# Altium PCB FOLLOWER_10_15.PcbDoc
Units mm, origin at the board's own origin, x right, y up, seen from the top; angles counter-clockwise.
Board outline 53 x 61 mm, 4 copper layers (Top Layer, Mid-Layer 1, Mid-Layer 2, Bottom Layer); 48 components, 40 nets, 211 pads, 89 vias.
Unrouted connection lines stored in the file: 49.
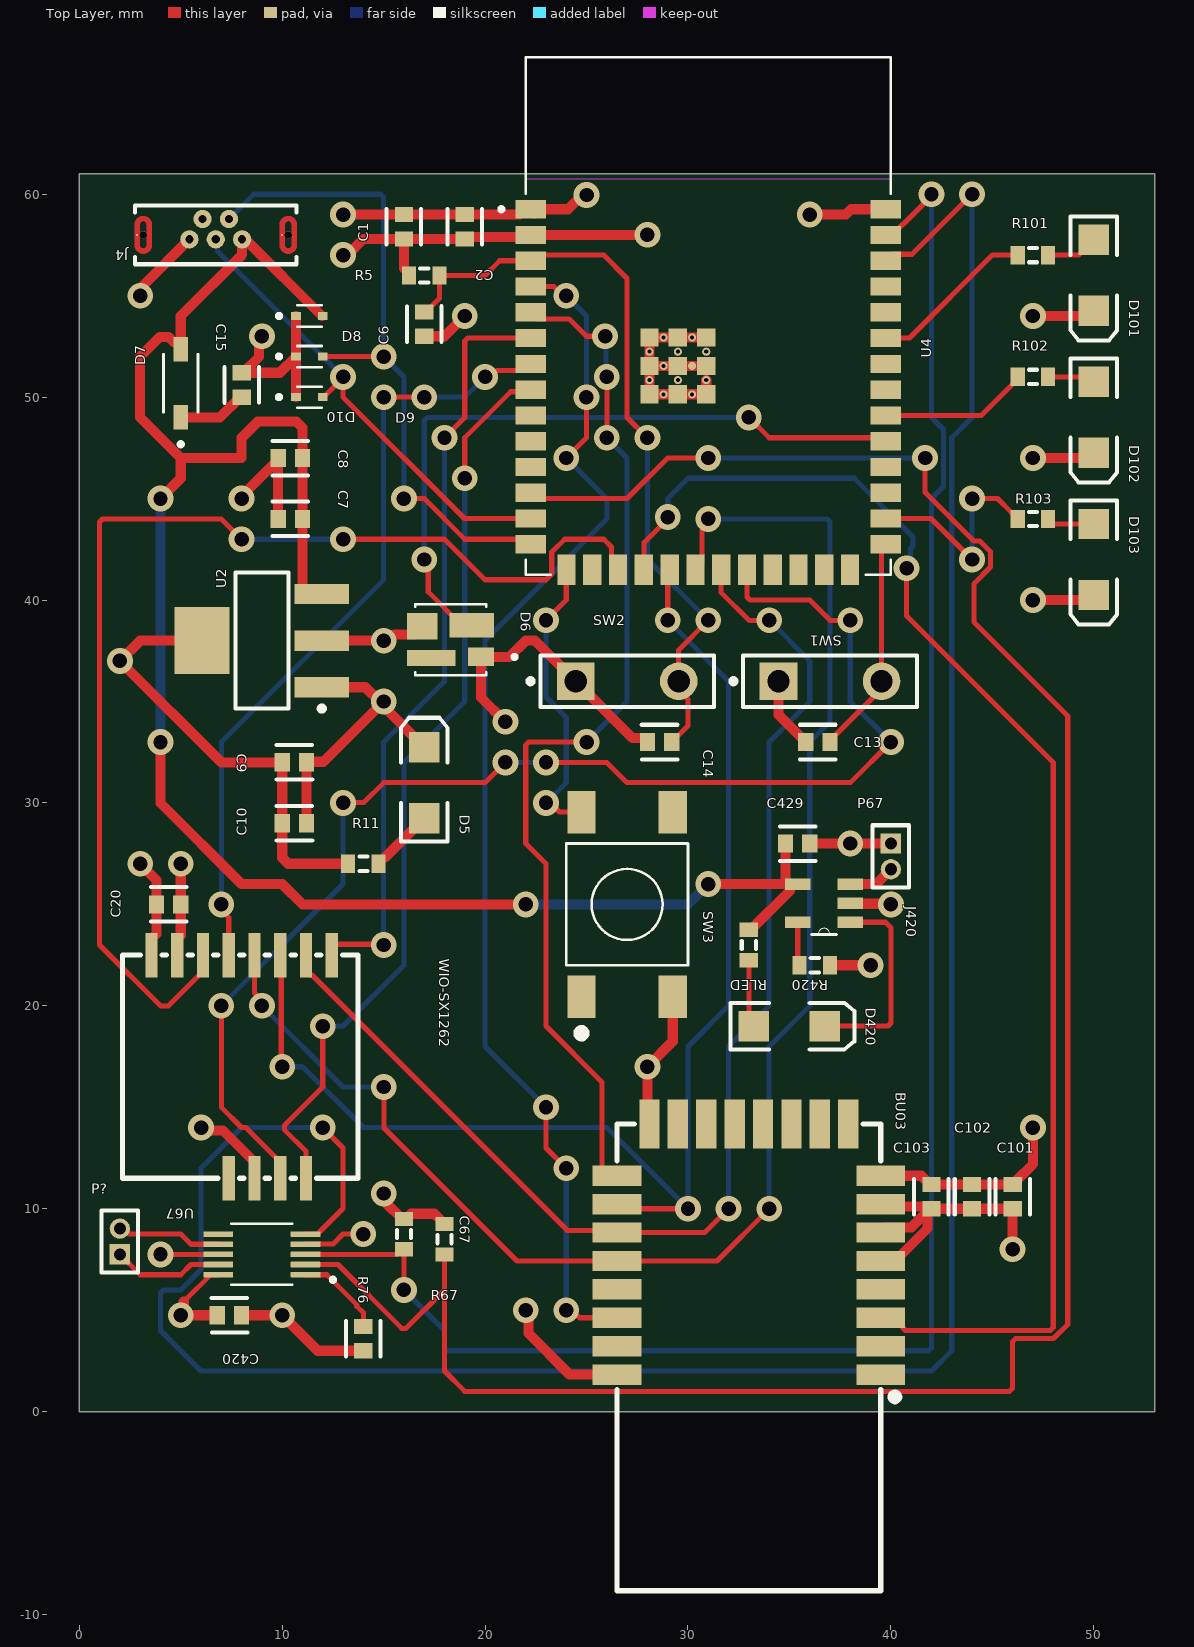
[diagram p0: Top Layer view]
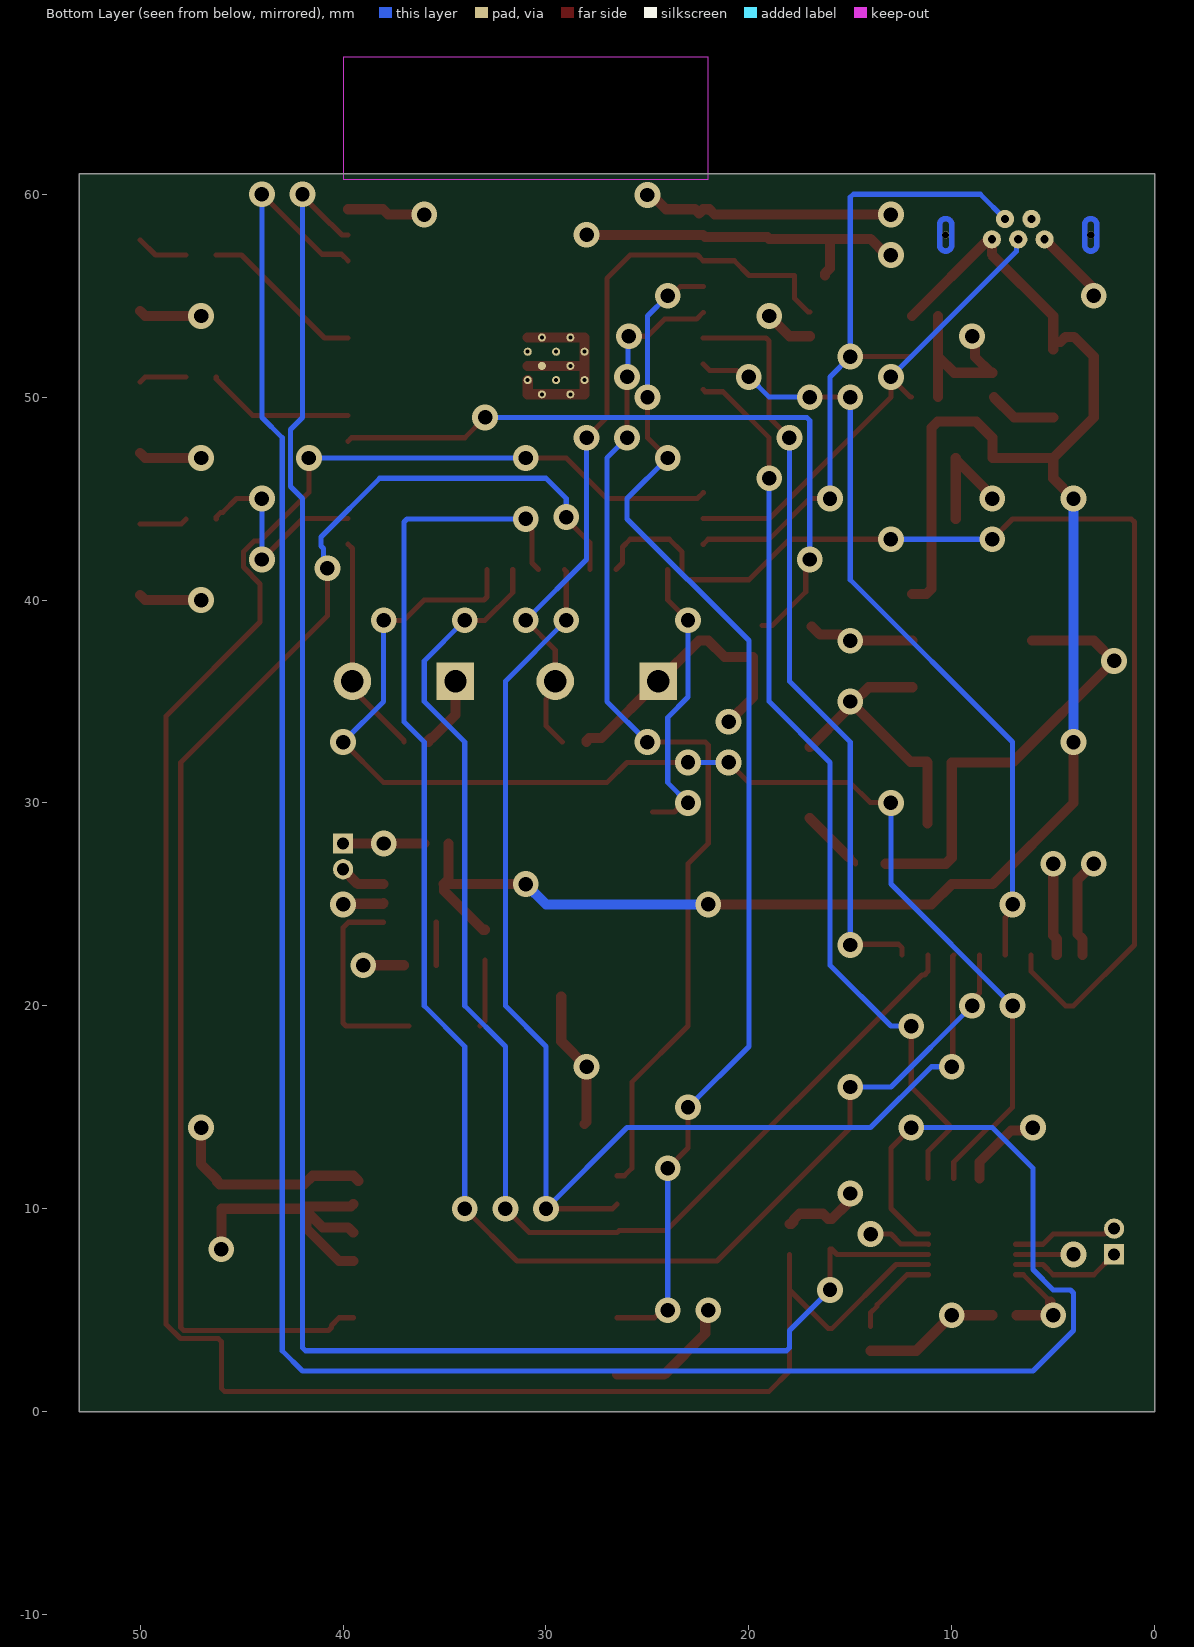
[diagram p1: Bottom Layer view, seen from below]
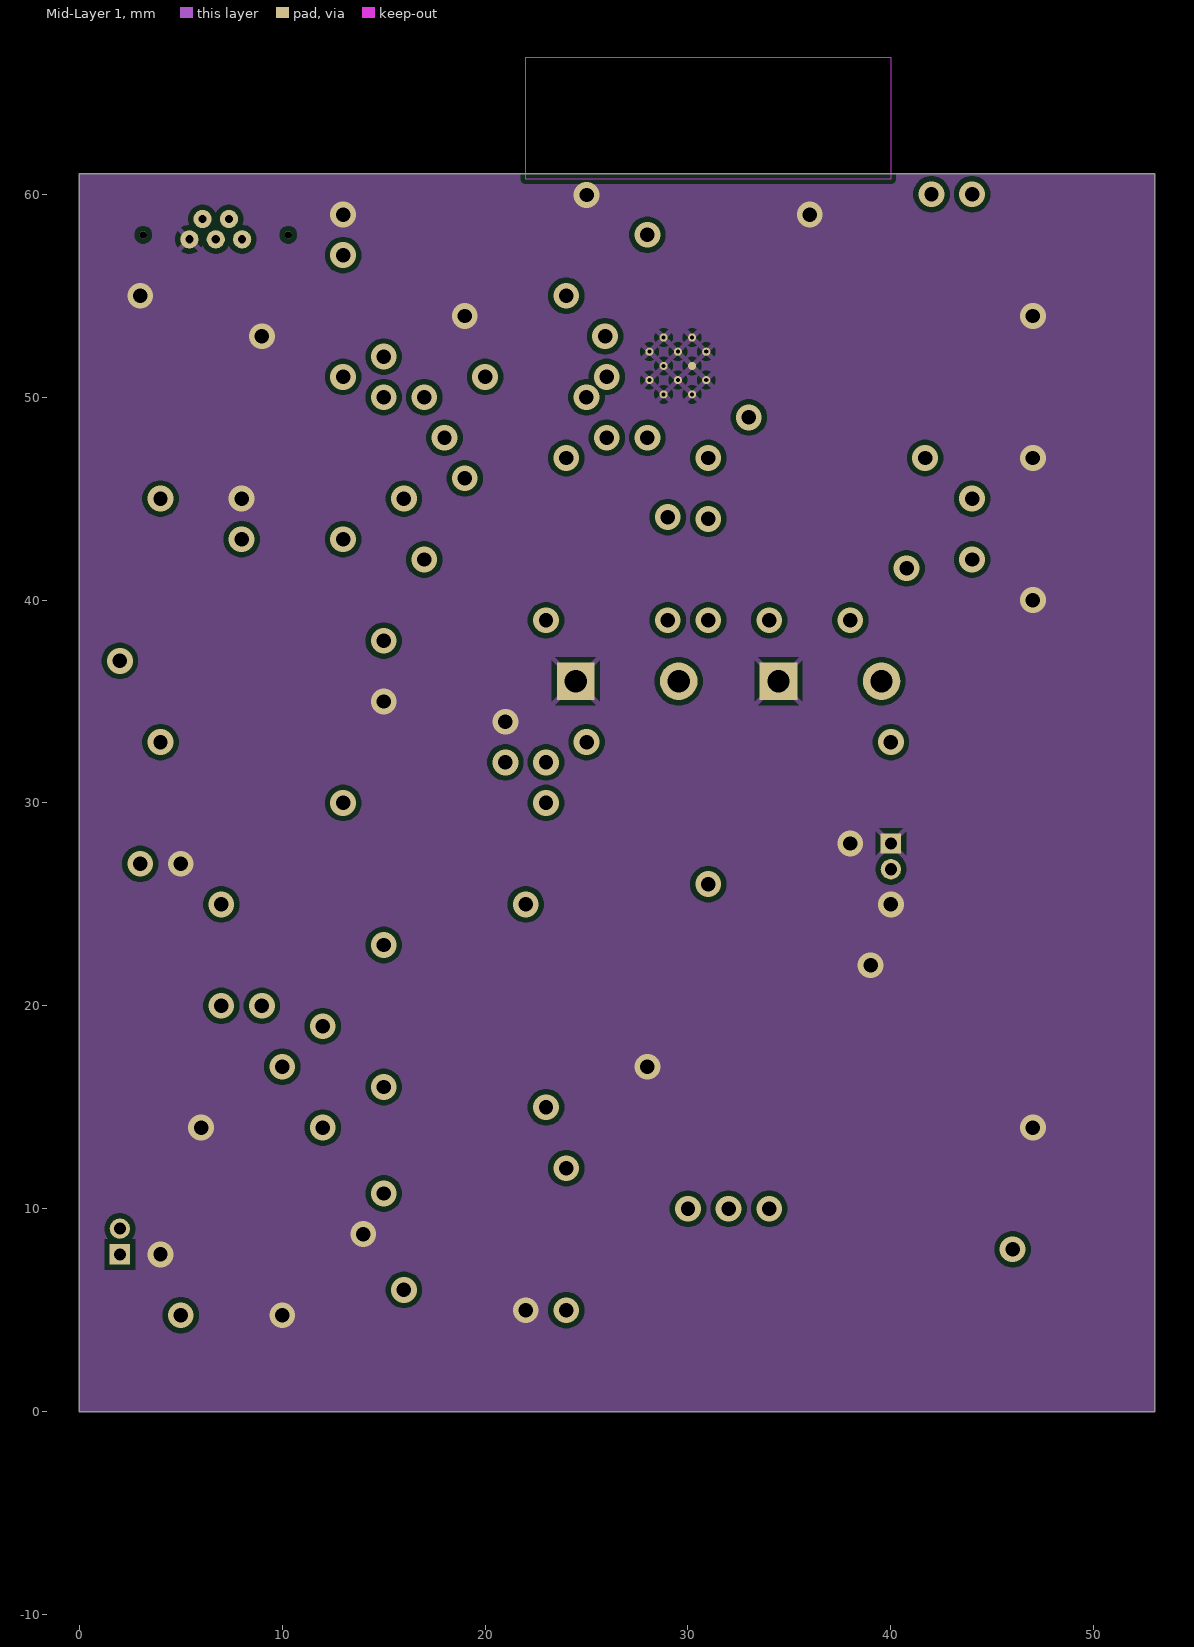
[diagram p2: Mid-Layer 1]
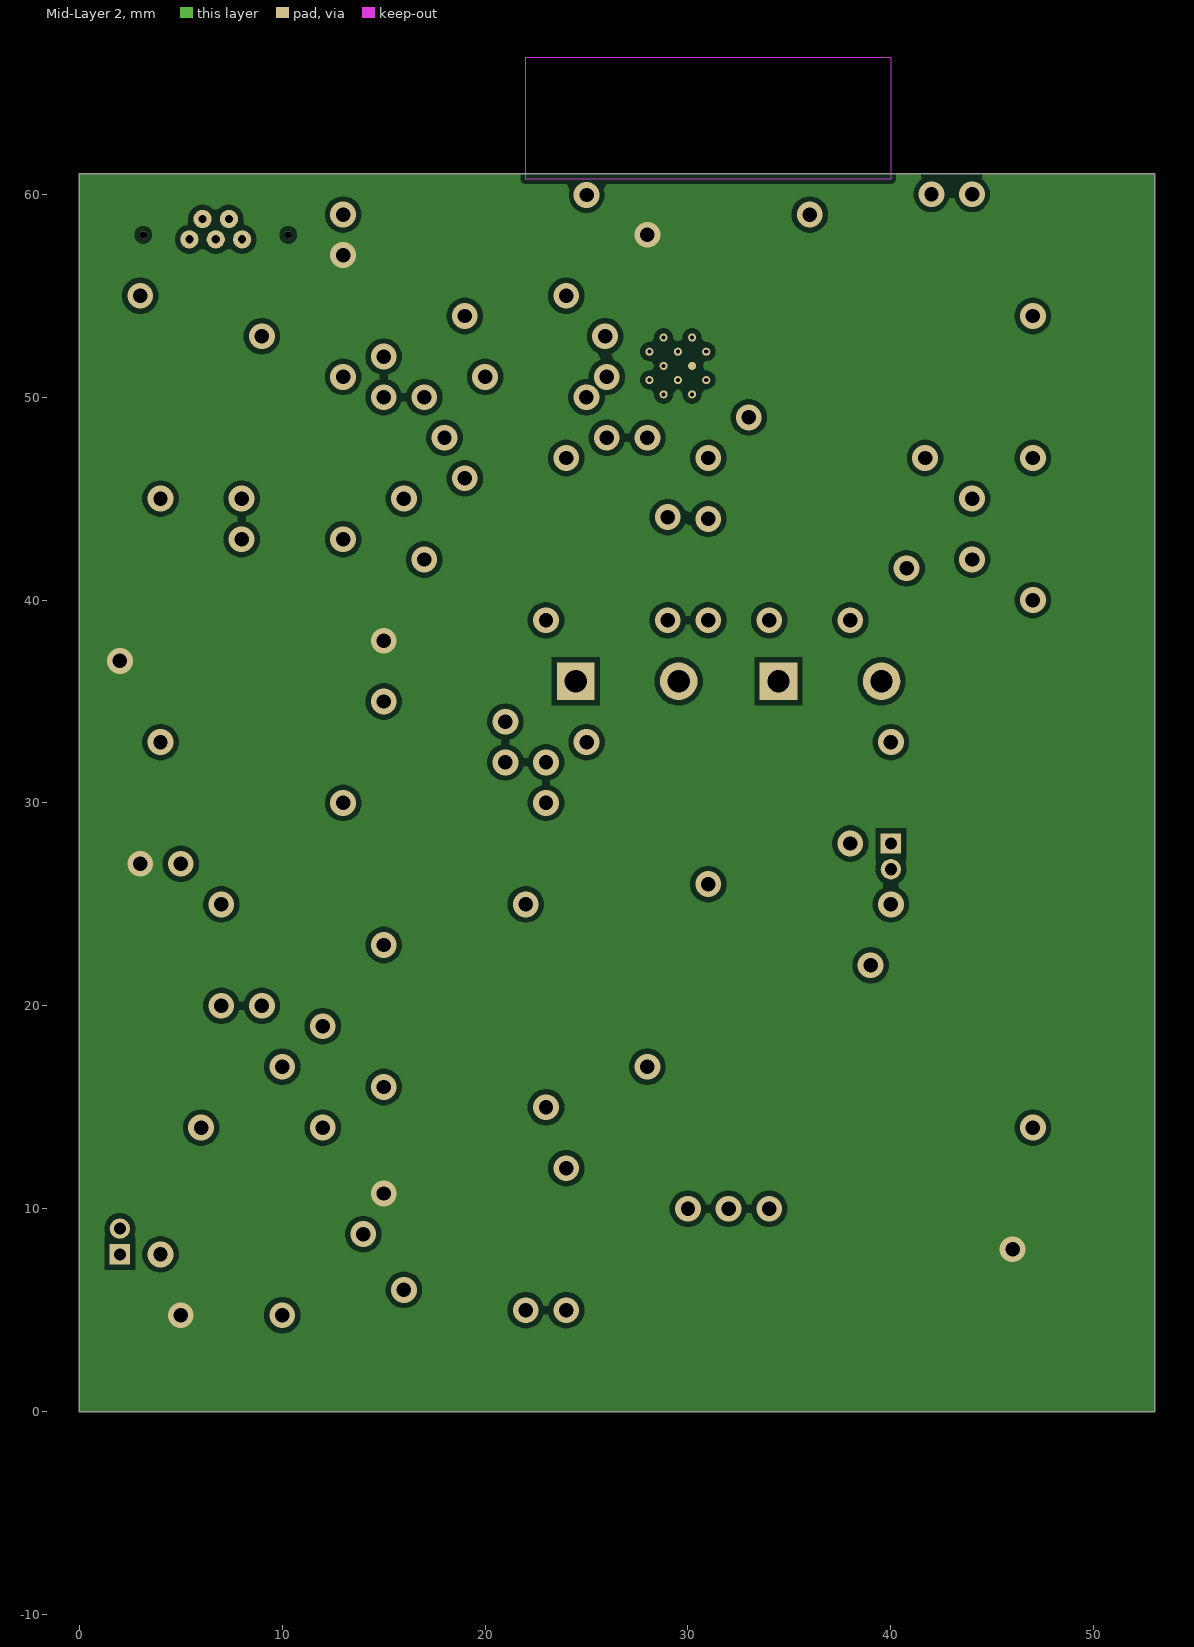
[diagram p3: Mid-Layer 2]
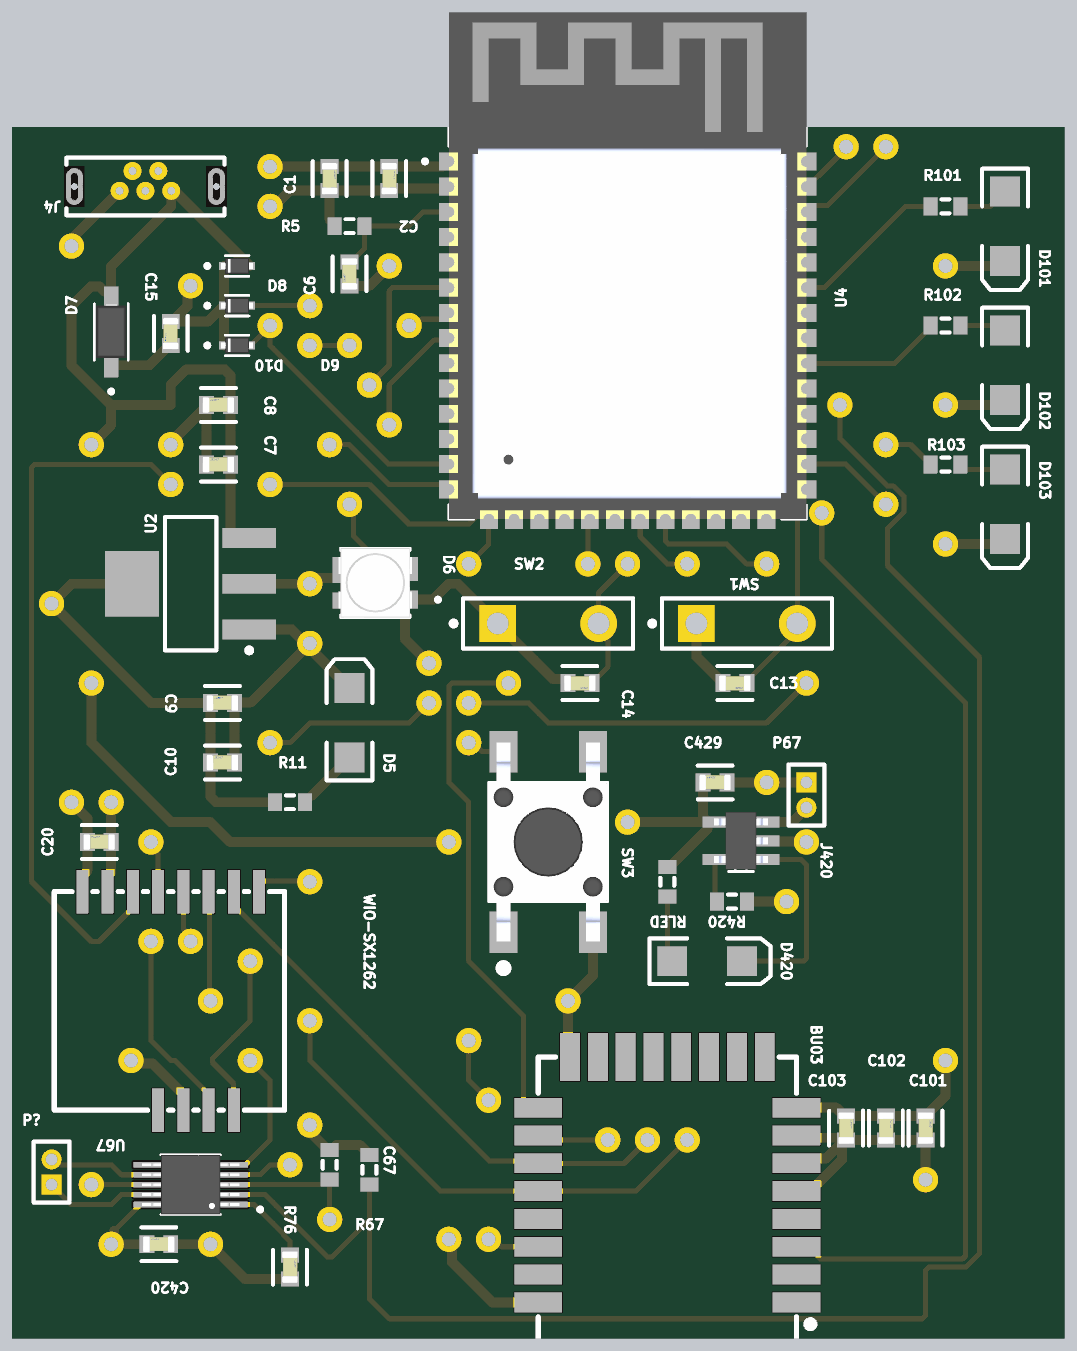
[diagram p4: 3D render of the assembled board from above, using the file's embedded part models]

## Layer stack, top to bottom
Top Solder: solder mask 0.0102, Solder Resist, Dk 3.5
Top Layer: signal copper 0.0356
Dielectric 1: dielectric 0.32, FR-4, Dk 4.8
Mid-Layer 1: signal copper 0.0356
Dielectric3: dielectric 0.32, FR-4, Dk 4.8
Mid-Layer 2: signal copper 0.0356
Dielectric2: dielectric 0.32, FR-4, Dk 4.8
Bottom Layer: signal copper 0.0356
Bottom Solder: solder mask 0.0102, Solder Resist, Dk 3.5

## Board outline
0,0 53,0 53,61 0,61

## Design rules (kind name [scope] priority, off if disabled: settings)
Clearance poly_clear [InPolygon] p1: gap=0.254 ignorepadtopadclearanceinfootprint=FALSE
Clearance [All] p2: gap=0.15 ignorepadtopadclearanceinfootprint=FALSE
Clearance U67_Clearance [InComponent('U67')] p3: gap=0.15 ignorepadtopadclearanceinfootprint=FALSE
HoleToHoleClearance [All] p1: gap=0.1 allowstackedmicrovias=TRUE
MinimumSolderMaskSliver [All] p1: minsoldermaskwidth=0.01
PolygonConnect [All] p1: thpad.connectstyle=Relief thpad.reliefconductorwidth=0.254 thpad.reliefentries=4 thpad.polygonreliefangle="45 Angle" thpad.airgapwidth=0.254 smdpad.connectstyle=Relief smdpad.reliefconductorwidth=0.254 smdpad.reliefentries=4 smdpad.polygonreliefangle="90 Angle" smdpad.airgapwidth=0.254 via.connectstyle=Direct via.reliefconductorwidth=0.254 via.reliefentries=4 via.polygonreliefangle="90 Angle" via.airgapwidth=0.254
RoutingVias [All] p1: holewidth=0.711 width=1.27 viastyle="Through Hole" minholewidth=0.711 minwidth=1.27 maxholewidth=0.711 maxwidth=1.27
SilkToSilkClearance [All] p1: silktosilkclearance=0.1
SilkToSolderMaskClearance [IsPad] p1: minsilkscreentomaskgap=0.1 clearancetoexposedcopper=TRUE
SolderMaskExpansion [All] p1: expansion=0 istentingtop=FALSE
Width C15 [InNet('C15_1')] p1: maxlimit=0.7 minlimit=0.254 preferedwidth=0.4
Width 3V3_Width [InNet('3V3')] p2: maxlimit=0.7 minlimit=0.254 preferedwidth=0.5
Width GD_WIDTH [InNet('GND')] p3: maxlimit=0.7 minlimit=0.254 preferedwidth=0.5
Width 5V_Width [InNet('5V')] p4: maxlimit=0.7 minlimit=0.254 preferedwidth=0.5
Width [All] p5: maxlimit=0.7 minlimit=0.254 preferedwidth=0.254
26 further rules are at their usual default settings.

## Components (designator, comment, footprint, x,y, rotation, side; value= is the part's Value field where it differs from the comment)
BU03 "6.4895GHz；7.9872GHz" WIRELM-SMD_BU03 33,8 r180 top
C1 "Cap" FP-C0603C-CF-MFG 19,58.4 r270 top value=10uF
C2 "Cap" FP-C0603C-CF-MFG 16,58.4 r270 top value=1uF
C6 "Cap" FP-C0603C-CF-MFG 17,53.6 r90 top value=1uF
C7 "Cap" FP-C0603C-CF-MFG 10.4,44 r0 top value=10uF
C8 "Cap" FP-C0603C-CF-MFG 10.4,47 r0 top value=.1uF
C9 "Cap" FP-C0603C-CF-MFG 10.6,32 r0 top value=.1uF
C10 "Cap" FP-C0603C-CF-MFG 10.6,29 r0 top value=10uF
C13 "Cap" FP-C0603C-CF-MFG 36.4,33 r180 top value=.1uF
C14 "Cap" FP-C0603C-CF-MFG 28.6,33 r180 top value=.1uF
C15 "Cap" FP-C0603C-CF-MFG 8,50.6 r90 top value=10uF
C20 "Cap" FP-C0603C-CF-MFG 4.4,25 r0 top value=1uF
C67 "Cap" FP-C0603C-CF-MFG 14,3.6 r270 top value=1uF
C101 "Cap" FP-C0603C-CF-MFG 46,10.6 r270 top value=100nF
C102 "Cap" FP-C0603C-CF-MFG 44,10.6 r270 top value=1uF
C103 "Cap" FP-C0603C-CF-MFG 42,10.6 r270 top value=10uF
C420 "Cap" FP-C0603C-CF-MFG 7.4,4.75 r0 top value=1uF
C429 "Cap" FP-C0603C-CF-MFG 35.4,28 r0 top value=4.7uF
D5 "LED2" 3.2X1.6X1.1 17,31 r90 top
D6 "SK6812MINI-012" LED_SK6812MINI-012 18.3,38.05 r180 top
D7 "1N5819HW-7-F" SOD3715X145N 5,50.68 r90 top
D8 "LESD5D5.0CT1G" TVS_LESD5D5.0CT1G 11.34,54 r0 top
D9 "LESD5D5.0CT1G" TVS_LESD5D5.0CT1G 11.34,50 r0 top
D10 "LESD5D5.0CT1G" TVS_LESD5D5.0CT1G 11.34,52 r0 top
D101 "LED2" 3.2X1.6X1.1 50,56 r270 top
D102 "LED2" 3.2X1.6X1.1 50,49 r270 top
D103 "LED2" 3.2X1.6X1.1 50,42 r270 top
D420 "LED2" 3.2X1.6X1.1 35,19 r0 top
J4 "USB3130-XX-X_REVD" GCT_USB3130-XX-X_REVD 6.725,58 r180 top
J420 "MCP73831T-2ACI/OT" SOT95P280X145-5N 36.705,25.06 r180 top
P67 "Header 2" MHDR1X2 40,28 r270 top
P? "Header 2" MHDR1X2 2,7.75 r90 top
R5 "Res3" J1-0603 17,56 r0 top value=10K
R11 "Res3" J1-0603 14,27 r0 top value=5.1K
R67 "Res3" J1-0603 18,8.5 r90 top value=4.7K
R76 "Res3" J1-0603 16,8.75 r90 top value=4.7K
R101 "Res3" J1-0603 47,57 r0 top value=4.7K
R102 "Res3" J1-0603 47,51 r0 top value=4.7K
R103 "Res3" J1-0603 47,44 r0 top value=4.7K
R420 "Res3" J1-0603 36.25,22 r0 top value=10K
RLED "Res3" J1-0603 33,23 r270 top value=1K
SW1 "NTC013-AT1J-A160T" SPST-2 37,36 r0 top
SW2 "NTC013-AT1J-A160T" SPST-2 27,36 r0 top
SW3 "4-1437565-9" TE_4-1437565-9 27,25 r90 top
U2 "SGM2212-3.3XKC3G/TR" SOT223_M 9,38 r180 top
U4 "ESP32-S3-WROOM-1" XCVR_ESP32S3WROOM1N8R8 31,54 r0 top
U67 "DRV2605LDGST" SOP50P490X110-10N 9,7.75 r180 top
WIO-SX1262 "WIO-SX1262" WIRELM-SMD_WIO-SX1262 8,17 r180 top

## Footprints (in the part's own frame and the unit in brackets; to place one, negate y for a bottom-side part, rotate by r counter-clockwise, add the part's x,y. Pads: shape width x height; smd on the part's side, far side on the other; paste and mask are expansions set on the pad)
3.2X1.6X1.1 [mm] "SMT LED; 2 Flat Leads"
  rect 1.5x1.5 smd: 1(-1.75,0) 2(1.75,0)
  silkscreen extent -2.9,-1.15 3.2,1.15
FP-C0603C-CF-MFG [mm]
  rect 0.75x0.9 smd paste+0 mask+0: 1(-0.6,0) 2(0.6,0)
  silkscreen extent -0.88,-0.85 0.88,0.85, body extent -1.2,-0.6 1.2,0.6, height 0.25
GCT_USB3130-XX-X_REVD [mm]
  round 0.9 hole 0.4: 1(-1.3,0.22) 2(-0.65,-0.78) 3(0,0.22) 4(0.65,-0.78) 5(1.3,0.22)
  rect 0.1x0.1 smd paste-1 mask+0: 6(-3.275,0) 7(3.875,0)
  round 0.35 hole 0.35 unplated: ""(-3.575,0) ""(3.575,0)
  Top Layer region: -3.553,0.924 -3.531,0.923 -3.509,0.92 -3.487,0.916 -3.465,0.911 -3.444,0.904 -3.423,0.897 -3.402,0.888 -3.382,0.879 -3.362,0.868 -3.344,0.856 -3.325,0.844 -3.308,0.83 -3.291,0.816 -3.274,0.801 -3.259,0.784 -3.245,0.767 -3.231,0.75 -3.219,0.731 -3.207,0.712 -3.196,0.693 -3.187,0.673 -3.178,0.652 -3.171,0.631 -3.164,0.61 -3.159,0.588 -3.155,0.566 -3.152,0.544 -3.151,0.522 -3.15,0.5 -3.15,0 -3.4,0 -3.4,0.5 -3.4,0.509 -3.401,0.518 -3.402,0.527 -3.404,0.536 -3.406,0.545 -3.409,0.554 -3.412,0.563 -3.415,0.571 -3.419,0.579 -3.423,0.587 -3.428,0.595 -3.433,0.603 -3.439,0.61 -3.445,0.617 -3.451,0.624 -3.458,0.63 -3.465,0.636 -3.472,0.642 -3.48,0.647 -3.487,0.652 -3.496,0.656 -3.504,0.66 -3.512,0.663 -3.521,0.666 -3.53,0.669 -3.539,0.671 -3.548,0.673 -3.557,0.674 -3.566,0.675 -3.584,0.675 -3.593,0.674 -3.602,0.673 -3.611,0.671 -3.62,0.669 -3.629,0.666 -3.638,0.663 -3.646,0.66 -3.654,0.656 -3.663,0.652 -3.67,0.647 -3.678,0.642 -3.685,0.636 -3.692,0.63 -3.699,0.624 -3.705,0.617 -3.711,0.61 -3.717,0.603 -3.722,0.595 -3.727,0.588 -3.731,0.579 -3.735,0.571 -3.738,0.563 -3.741,0.554 -3.744,0.545 -3.746,0.536 -3.748,0.527 -3.749,0.518 -3.75,0.509 -3.75,0.5 -3.75,0 -4,0 -4,0.5 -3.999,0.522 -3.998,0.544 -3.995,0.566 -3.991,0.588 -3.986,0.61 -3.979,0.631 -3.972,0.652 -3.963,0.673 -3.954,0.693 -3.943,0.713 -3.931,0.731 -3.919,0.75 -3.905,0.767 -3.891,0.784 -3.876,0.801 -3.859,0.816 -3.842,0.83 -3.825,0.844 -3.806,0.856 -3.788,0.868 -3.768,0.879 -3.748,0.888 -3.727,0.897 -3.706,0.904 -3.685,0.911 -3.663,0.916 -3.641,0.92 -3.619,0.923 -3.597,0.924 -3.575,0.925
  Top Layer region: -3.15,-0.5 -3.151,-0.522 -3.152,-0.544 -3.155,-0.566 -3.159,-0.588 -3.164,-0.61 -3.171,-0.631 -3.178,-0.652 -3.187,-0.673 -3.196,-0.693 -3.207,-0.712 -3.219,-0.731 -3.231,-0.75 -3.245,-0.767 -3.259,-0.784 -3.274,-0.801 -3.291,-0.816 -3.308,-0.83 -3.325,-0.844 -3.344,-0.856 -3.362,-0.868 -3.382,-0.879 -3.402,-0.888 -3.423,-0.897 -3.444,-0.904 -3.465,-0.911 -3.487,-0.916 -3.509,-0.92 -3.531,-0.923 -3.553,-0.924 -3.575,-0.925 -3.597,-0.924 -3.619,-0.923 -3.641,-0.92 -3.663,-0.916 -3.685,-0.911 -3.706,-0.904 -3.727,-0.897 -3.748,-0.888 -3.768,-0.879 -3.788,-0.868 -3.806,-0.856 -3.825,-0.844 -3.842,-0.83 -3.859,-0.816 -3.876,-0.801 -3.891,-0.784 -3.905,-0.767 -3.919,-0.75 -3.931,-0.731 -3.943,-0.713 -3.954,-0.693 -3.963,-0.673 -3.972,-0.652 -3.979,-0.631 -3.986,-0.61 -3.991,-0.588 -3.995,-0.566 -3.998,-0.544 -3.999,-0.522 -4,-0.5 -4,0 -3.75,0 -3.75,-0.5 -3.75,-0.509 -3.749,-0.518 -3.748,-0.527 -3.746,-0.536 -3.744,-0.545 -3.741,-0.554 -3.738,-0.563 -3.735,-0.571 -3.731,-0.579 -3.727,-0.588 -3.722,-0.595 -3.717,-0.603 -3.711,-0.61 -3.705,-0.617 -3.699,-0.624 -3.692,-0.63 -3.685,-0.636 -3.678,-0.642 -3.67,-0.647 -3.663,-0.652 -3.654,-0.656 -3.646,-0.66 -3.638,-0.663 -3.629,-0.666 -3.62,-0.669 -3.611,-0.671 -3.602,-0.673 -3.593,-0.674 -3.584,-0.675 -3.566,-0.675 -3.557,-0.674 -3.548,-0.673 -3.539,-0.671 -3.53,-0.669 -3.521,-0.666 -3.512,-0.663 -3.504,-0.66 -3.496,-0.656 -3.487,-0.652 -3.48,-0.647 -3.472,-0.642 -3.465,-0.636 -3.458,-0.63 -3.451,-0.624 -3.445,-0.617 -3.439,-0.61 -3.433,-0.603 -3.428,-0.595 -3.423,-0.587 -3.419,-0.579 -3.415,-0.571 -3.412,-0.563 -3.409,-0.554 -3.406,-0.545 -3.404,-0.536 -3.402,-0.527 -3.401,-0.518 -3.4,-0.509 -3.4,-0.5 -3.4,0 -3.15,0
  Top Layer region: 3.597,0.924 3.619,0.923 3.641,0.92 3.663,0.916 3.685,0.911 3.706,0.904 3.727,0.897 3.748,0.888 3.768,0.879 3.788,0.868 3.806,0.856 3.825,0.844 3.842,0.83 3.859,0.816 3.876,0.801 3.891,0.784 3.905,0.767 3.919,0.75 3.931,0.731 3.943,0.713 3.954,0.693 3.963,0.673 3.972,0.652 3.979,0.631 3.986,0.61 3.991,0.588 3.995,0.566 3.998,0.544 3.999,0.522 4,0.5 4,0 3.75,0 3.75,0.5 3.75,0.509 3.749,0.518 3.748,0.527 3.746,0.536 3.744,0.545 3.741,0.554 3.738,0.563 3.735,0.571 3.731,0.579 3.727,0.588 3.722,0.595 3.717,0.603 3.711,0.61 3.705,0.617 3.699,0.624 3.692,0.63 3.685,0.636 3.678,0.642 3.67,0.647 3.663,0.652 3.654,0.656 3.646,0.66 3.638,0.663 3.629,0.666 3.62,0.669 3.611,0.671 3.602,0.673 3.593,0.674 3.584,0.675 3.566,0.675 3.557,0.674 3.548,0.673 3.539,0.671 3.53,0.669 3.521,0.666 3.512,0.663 3.504,0.66 3.496,0.656 3.487,0.652 3.48,0.647 3.472,0.642 3.465,0.636 3.458,0.63 3.451,0.624 3.445,0.617 3.439,0.61 3.433,0.603 3.428,0.595 3.423,0.587 3.419,0.579 3.415,0.571 3.412,0.563 3.409,0.554 3.406,0.545 3.404,0.536 3.402,0.527 3.401,0.518 3.4,0.509 3.4,0.5 3.4,0 3.15,0 3.15,0.5 3.151,0.522 3.152,0.544 3.155,0.566 3.159,0.588 3.164,0.61 3.171,0.631 3.178,0.652 3.187,0.673 3.196,0.693 3.207,0.712 3.219,0.731 3.231,0.75 3.245,0.767 3.259,0.784 3.274,0.801 3.291,0.816 3.308,0.83 3.325,0.844 3.344,0.856 3.362,0.868 3.382,0.879 3.402,0.888 3.423,0.897 3.444,0.904 3.465,0.911 3.487,0.916 3.509,0.92 3.531,0.923 3.553,0.924 3.575,0.925
  Top Layer region: 4,-0.5 3.999,-0.522 3.998,-0.544 3.995,-0.566 3.991,-0.588 3.986,-0.61 3.979,-0.631 3.972,-0.652 3.963,-0.673 3.954,-0.693 3.943,-0.713 3.931,-0.731 3.919,-0.75 3.905,-0.767 3.891,-0.784 3.876,-0.801 3.859,-0.816 3.842,-0.83 3.825,-0.844 3.806,-0.856 3.788,-0.868 3.768,-0.879 3.748,-0.888 3.727,-0.897 3.706,-0.904 3.685,-0.911 3.663,-0.916 3.641,-0.92 3.619,-0.923 3.597,-0.924 3.575,-0.925 3.553,-0.924 3.531,-0.923 3.509,-0.92 3.487,-0.916 3.465,-0.911 3.444,-0.904 3.423,-0.897 3.402,-0.888 3.382,-0.879 3.362,-0.868 3.344,-0.856 3.325,-0.844 3.308,-0.83 3.291,-0.816 3.274,-0.801 3.259,-0.784 3.245,-0.767 3.231,-0.75 3.219,-0.731 3.207,-0.712 3.196,-0.693 3.187,-0.673 3.178,-0.652 3.171,-0.631 3.164,-0.61 3.159,-0.588 3.155,-0.566 3.152,-0.544 3.151,-0.522 3.15,-0.5 3.15,0 3.4,0 3.4,-0.5 3.4,-0.509 3.401,-0.518 3.402,-0.527 3.404,-0.536 3.406,-0.545 3.409,-0.554 3.412,-0.563 3.415,-0.571 3.419,-0.579 3.423,-0.587 3.428,-0.595 3.433,-0.603 3.439,-0.61 3.445,-0.617 3.451,-0.624 3.458,-0.63 3.465,-0.636 3.472,-0.642 3.48,-0.647 3.487,-0.652 3.496,-0.656 3.504,-0.66 3.512,-0.663 3.521,-0.666 3.53,-0.669 3.539,-0.671 3.548,-0.673 3.557,-0.674 3.566,-0.675 3.584,-0.675 3.593,-0.674 3.602,-0.673 3.611,-0.671 3.62,-0.669 3.629,-0.666 3.638,-0.663 3.646,-0.66 3.654,-0.656 3.663,-0.652 3.67,-0.647 3.678,-0.642 3.685,-0.636 3.692,-0.63 3.699,-0.624 3.705,-0.617 3.711,-0.61 3.717,-0.603 3.722,-0.595 3.727,-0.588 3.731,-0.579 3.735,-0.571 3.738,-0.563 3.741,-0.554 3.744,-0.545 3.746,-0.536 3.748,-0.527 3.749,-0.518 3.75,-0.509 3.75,-0.5 3.75,0 4,0
  Bottom Layer region: -3.553,0.924 -3.531,0.923 -3.509,0.92 -3.487,0.916 -3.465,0.911 -3.444,0.904 -3.423,0.897 -3.402,0.888 -3.382,0.879 -3.362,0.868 -3.344,0.856 -3.325,0.844 -3.308,0.83 -3.291,0.816 -3.274,0.801 -3.259,0.784 -3.245,0.767 -3.231,0.75 -3.219,0.731 -3.207,0.712 -3.196,0.693 -3.187,0.673 -3.178,0.652 -3.171,0.631 -3.164,0.61 -3.159,0.588 -3.155,0.566 -3.152,0.544 -3.151,0.522 -3.15,0.5 -3.15,0 -3.4,0 -3.4,0.5 -3.4,0.509 -3.401,0.518 -3.402,0.527 -3.404,0.536 -3.406,0.545 -3.409,0.554 -3.412,0.563 -3.415,0.571 -3.419,0.579 -3.423,0.587 -3.428,0.595 -3.433,0.603 -3.439,0.61 -3.445,0.617 -3.451,0.624 -3.458,0.63 -3.465,0.636 -3.472,0.642 -3.48,0.647 -3.487,0.652 -3.496,0.656 -3.504,0.66 -3.512,0.663 -3.521,0.666 -3.53,0.669 -3.539,0.671 -3.548,0.673 -3.557,0.674 -3.566,0.675 -3.584,0.675 -3.593,0.674 -3.602,0.673 -3.611,0.671 -3.62,0.669 -3.629,0.666 -3.638,0.663 -3.646,0.66 -3.654,0.656 -3.663,0.652 -3.67,0.647 -3.678,0.642 -3.685,0.636 -3.692,0.63 -3.699,0.624 -3.705,0.617 -3.711,0.61 -3.717,0.603 -3.722,0.595 -3.727,0.588 -3.731,0.579 -3.735,0.571 -3.738,0.563 -3.741,0.554 -3.744,0.545 -3.746,0.536 -3.748,0.527 -3.749,0.518 -3.75,0.509 -3.75,0.5 -3.75,0 -4,0 -4,0.5 -3.999,0.522 -3.998,0.544 -3.995,0.566 -3.991,0.588 -3.986,0.61 -3.979,0.631 -3.972,0.652 -3.963,0.673 -3.954,0.693 -3.943,0.713 -3.931,0.731 -3.919,0.75 -3.905,0.767 -3.891,0.784 -3.876,0.801 -3.859,0.816 -3.842,0.83 -3.825,0.844 -3.806,0.856 -3.788,0.868 -3.768,0.879 -3.748,0.888 -3.727,0.897 -3.706,0.904 -3.685,0.911 -3.663,0.916 -3.641,0.92 -3.619,0.923 -3.597,0.924 -3.575,0.925
  Bottom Layer region: -3.15,-0.5 -3.151,-0.522 -3.152,-0.544 -3.155,-0.566 -3.159,-0.588 -3.164,-0.61 -3.171,-0.631 -3.178,-0.652 -3.187,-0.673 -3.196,-0.693 -3.207,-0.712 -3.219,-0.731 -3.231,-0.75 -3.245,-0.767 -3.259,-0.784 -3.274,-0.801 -3.291,-0.816 -3.308,-0.83 -3.325,-0.844 -3.344,-0.856 -3.362,-0.868 -3.382,-0.879 -3.402,-0.888 -3.423,-0.897 -3.444,-0.904 -3.465,-0.911 -3.487,-0.916 -3.509,-0.92 -3.531,-0.923 -3.553,-0.924 -3.575,-0.925 -3.597,-0.924 -3.619,-0.923 -3.641,-0.92 -3.663,-0.916 -3.685,-0.911 -3.706,-0.904 -3.727,-0.897 -3.748,-0.888 -3.768,-0.879 -3.788,-0.868 -3.806,-0.856 -3.825,-0.844 -3.842,-0.83 -3.859,-0.816 -3.876,-0.801 -3.891,-0.784 -3.905,-0.767 -3.919,-0.75 -3.931,-0.731 -3.943,-0.713 -3.954,-0.693 -3.963,-0.673 -3.972,-0.652 -3.979,-0.631 -3.986,-0.61 -3.991,-0.588 -3.995,-0.566 -3.998,-0.544 -3.999,-0.522 -4,-0.5 -4,0 -3.75,0 -3.75,-0.5 -3.75,-0.509 -3.749,-0.518 -3.748,-0.527 -3.746,-0.536 -3.744,-0.545 -3.741,-0.554 -3.738,-0.563 -3.735,-0.571 -3.731,-0.579 -3.727,-0.588 -3.722,-0.595 -3.717,-0.603 -3.711,-0.61 -3.705,-0.617 -3.699,-0.624 -3.692,-0.63 -3.685,-0.636 -3.678,-0.642 -3.67,-0.647 -3.663,-0.652 -3.654,-0.656 -3.646,-0.66 -3.638,-0.663 -3.629,-0.666 -3.62,-0.669 -3.611,-0.671 -3.602,-0.673 -3.593,-0.674 -3.584,-0.675 -3.566,-0.675 -3.557,-0.674 -3.548,-0.673 -3.539,-0.671 -3.53,-0.669 -3.521,-0.666 -3.512,-0.663 -3.504,-0.66 -3.496,-0.656 -3.487,-0.652 -3.48,-0.647 -3.472,-0.642 -3.465,-0.636 -3.458,-0.63 -3.451,-0.624 -3.445,-0.617 -3.439,-0.61 -3.433,-0.603 -3.428,-0.595 -3.423,-0.587 -3.419,-0.579 -3.415,-0.571 -3.412,-0.563 -3.409,-0.554 -3.406,-0.545 -3.404,-0.536 -3.402,-0.527 -3.401,-0.518 -3.4,-0.509 -3.4,-0.5 -3.4,0 -3.15,0
  Bottom Layer region: 3.597,0.924 3.619,0.923 3.641,0.92 3.663,0.916 3.685,0.911 3.706,0.904 3.727,0.897 3.748,0.888 3.768,0.879 3.788,0.868 3.806,0.856 3.825,0.844 3.842,0.83 3.859,0.816 3.876,0.801 3.891,0.784 3.905,0.767 3.919,0.75 3.931,0.731 3.943,0.713 3.954,0.693 3.963,0.673 3.972,0.652 3.979,0.631 3.986,0.61 3.991,0.588 3.995,0.566 3.998,0.544 3.999,0.522 4,0.5 4,0 3.75,0 3.75,0.5 3.75,0.509 3.749,0.518 3.748,0.527 3.746,0.536 3.744,0.545 3.741,0.554 3.738,0.563 3.735,0.571 3.731,0.579 3.727,0.588 3.722,0.595 3.717,0.603 3.711,0.61 3.705,0.617 3.699,0.624 3.692,0.63 3.685,0.636 3.678,0.642 3.67,0.647 3.663,0.652 3.654,0.656 3.646,0.66 3.638,0.663 3.629,0.666 3.62,0.669 3.611,0.671 3.602,0.673 3.593,0.674 3.584,0.675 3.566,0.675 3.557,0.674 3.548,0.673 3.539,0.671 3.53,0.669 3.521,0.666 3.512,0.663 3.504,0.66 3.496,0.656 3.487,0.652 3.48,0.647 3.472,0.642 3.465,0.636 3.458,0.63 3.451,0.624 3.445,0.617 3.439,0.61 3.433,0.603 3.428,0.595 3.423,0.587 3.419,0.579 3.415,0.571 3.412,0.563 3.409,0.554 3.406,0.545 3.404,0.536 3.402,0.527 3.401,0.518 3.4,0.509 3.4,0.5 3.4,0 3.15,0 3.15,0.5 3.151,0.522 3.152,0.544 3.155,0.566 3.159,0.588 3.164,0.61 3.171,0.631 3.178,0.652 3.187,0.673 3.196,0.693 3.207,0.712 3.219,0.731 3.231,0.75 3.245,0.767 3.259,0.784 3.274,0.801 3.291,0.816 3.308,0.83 3.325,0.844 3.344,0.856 3.362,0.868 3.382,0.879 3.402,0.888 3.423,0.897 3.444,0.904 3.465,0.911 3.487,0.916 3.509,0.92 3.531,0.923 3.553,0.924 3.575,0.925
  Bottom Layer region: 4,-0.5 3.999,-0.522 3.998,-0.544 3.995,-0.566 3.991,-0.588 3.986,-0.61 3.979,-0.631 3.972,-0.652 3.963,-0.673 3.954,-0.693 3.943,-0.713 3.931,-0.731 3.919,-0.75 3.905,-0.767 3.891,-0.784 3.876,-0.801 3.859,-0.816 3.842,-0.83 3.825,-0.844 3.806,-0.856 3.788,-0.868 3.768,-0.879 3.748,-0.888 3.727,-0.897 3.706,-0.904 3.685,-0.911 3.663,-0.916 3.641,-0.92 3.619,-0.923 3.597,-0.924 3.575,-0.925 3.553,-0.924 3.531,-0.923 3.509,-0.92 3.487,-0.916 3.465,-0.911 3.444,-0.904 3.423,-0.897 3.402,-0.888 3.382,-0.879 3.362,-0.868 3.344,-0.856 3.325,-0.844 3.308,-0.83 3.291,-0.816 3.274,-0.801 3.259,-0.784 3.245,-0.767 3.231,-0.75 3.219,-0.731 3.207,-0.712 3.196,-0.693 3.187,-0.673 3.178,-0.652 3.171,-0.631 3.164,-0.61 3.159,-0.588 3.155,-0.566 3.152,-0.544 3.151,-0.522 3.15,-0.5 3.15,0 3.4,0 3.4,-0.5 3.4,-0.509 3.401,-0.518 3.402,-0.527 3.404,-0.536 3.406,-0.545 3.409,-0.554 3.412,-0.563 3.415,-0.571 3.419,-0.579 3.423,-0.587 3.428,-0.595 3.433,-0.603 3.439,-0.61 3.445,-0.617 3.451,-0.624 3.458,-0.63 3.465,-0.636 3.472,-0.642 3.48,-0.647 3.487,-0.652 3.496,-0.656 3.504,-0.66 3.512,-0.663 3.521,-0.666 3.53,-0.669 3.539,-0.671 3.548,-0.673 3.557,-0.674 3.566,-0.675 3.584,-0.675 3.593,-0.674 3.602,-0.673 3.611,-0.671 3.62,-0.669 3.629,-0.666 3.638,-0.663 3.646,-0.66 3.654,-0.656 3.663,-0.652 3.67,-0.647 3.678,-0.642 3.685,-0.636 3.692,-0.63 3.699,-0.624 3.705,-0.617 3.711,-0.61 3.717,-0.603 3.722,-0.595 3.727,-0.588 3.731,-0.579 3.735,-0.571 3.738,-0.563 3.741,-0.554 3.744,-0.545 3.746,-0.536 3.748,-0.527 3.749,-0.518 3.75,-0.509 3.75,-0.5 3.75,0 4,0
  silkscreen extent -3.98,-1.45 3.98,1.45
J1-0603 [mm] "Chip Resistor, Body 1.6x0.8mm, IPC High Density"
  rect 0.7x0.9 smd: 1(-0.75,0) 2(0.75,0)
  silkscreen extent -0.2,-0.35 0.2,0.35, body extent -0.85,-0.48 0.85,0.48, height 0.9
LED_SK6812MINI-012 [mm]
  rect 1.3x0.9 smd: 1(-1.5,0.85)
  rect 2.2x1.2 smd: 2(-1.05,-0.7)
  rect 1.5x1.3 smd: 3(1.4,-0.65)
  rect 2.4x0.8 smd: 4(0.95,0.9)
  silkscreen extent -3.25,-1.75 1.75,1.75, body extent -1.85,-1.75 1.85,1.75, height 1.1
MHDR1X2 [mm] "Connector; Header; 2 Position"
  rect 1x1 hole 0.6: 1(0,0)
  round 1 hole 0.6: 2(1.27,0)
  silkscreen extent -0.9,-0.9 2.17,0.9
SOD3715X145N [mm]
  rect 1.21x0.73 smd: A(1.68,0) C(-1.68,0)
  silkscreen extent -3.1,-0.85 1.43,0.85, body extent -1.83,-0.77 1.83,0.77, height 0.8
SOP50P490X110-10N [mm]
  rrect25% 1.47x0.28 smd paste+0 mask+0.102: 1(-2.15,1) 2(-2.15,0.5) 3(-2.15,0) 4(-2.15,-0.5) 5(-2.15,-1) 6(2.15,-1) 7(2.15,-0.5) 8(2.15,0) 9(2.15,0.5) 10(2.15,1)
  silkscreen extent -3.6,-1.5 1.5,1.5, body extent -2.45,-1.5 2.45,1.5, height 1.1
SOT95P280X145-5N [mil]
  rect 50x22 smd: 1(-51,37) 2(-51,0) 3(-51,-37) 4(51,-37) 5(51,37)
  silkscreen extent -24,49 24,61, body extent -53,-57 53,57, height 57
SOT223_M [mm] "SOT223, 4-Leads, Body 6.5x3.5mm, Pitch 2.3mm, Lead Span 7mm, IPC Low Density"
  rect 2.7x1 smd: 1(-2.95,2.3) 2(-2.95,0) 3(-2.95,-2.3)
  rect 2.7x3.3 smd: 4(2.95,0)
  silkscreen extent -3.08,-3.35 1.3,3.47, body extent -1.85,-3.35 1.85,3.35, height 1.7
SPST-2 [mm] "Switch; 2 Leads"
  rect 1.85x1.85 hole 1.1: 1(-2.54,0)
  round 1.85 hole 1.1: 2(2.54,0)
  silkscreen extent -4.89,-1.27 4.28,1.27
TE_4-1437565-9 [mm]
  rect 2.1x1.4 smd: 1(-4.55,2.25) 2(4.55,2.25) 3(-4.55,-2.25) 4(4.55,-2.25)
  silkscreen extent -6.55,-3 3,3, body extent -5,-3 5,3, height 7.26
TVS_LESD5D5.0CT1G [mm]
  rect 0.48x0.4 smd: 1(-0.66,0) 2(0.66,0)
  silkscreen extent -1.6,-0.52 0.6,0.52, body extent -0.8,-0.4 0.8,0.4, height 0.7
WIRELM-SMD_BU03 [mm]
  rect 2.4x1 smd paste+0 mask+0.05: 1(-6.5,6.175) 2(-6.5,4.775) 3(-6.5,3.375) 4(-6.5,1.975) 5(-6.5,0.575) 6(-6.5,-0.825) 7(-6.5,-2.225) 8(-6.5,-3.625) 17(6.5,-3.625) 18(6.5,-2.225) 19(6.5,-0.825) 20(6.5,0.575) 21(6.5,1.975) 22(6.5,3.375) 23(6.5,4.775) 24(6.5,6.175)
  rect 1x2.4 smd paste+0 mask+0.05: 9(-4.9,-6.175) 10(-3.5,-6.175) 11(-2.1,-6.175) 12(-0.7,-6.175) 13(0.7,-6.175) 14(2.1,-6.175) 15(3.5,-6.175) 16(4.9,-6.175)
  silkscreen extent -7.55,-6.18 6.5,16.82
WIRELM-SMD_WIO-SX1262 [mm]
  rect 0.6x2.2 smd paste+0 mask+0.051: 1(-4.445,-5.5) 2(-3.175,-5.5) 3(-1.905,-5.5) 4(-0.635,-5.5) 5(0.635,-5.5) 6(1.905,-5.5) 7(3.175,-5.5) 8(4.445,-5.5) 9(0.635,5.5) 10(-0.635,5.5) 11(-1.905,5.5) 12(-3.175,5.5)
  silkscreen extent -5.73,-5.5 5.86,5.5
XCVR_ESP32S3WROOM1N8R8 [mm]
  rect 1.5x0.9 smd: 1(-8.75,5.26) 2(-8.75,3.99) 3(-8.75,2.72) 4(-8.75,1.45) 6(-8.75,-1.09) 7(-8.75,-2.36) 8(-8.75,-3.63) 9(-8.75,-4.9) 10(-8.75,-6.17) 11(-8.75,-7.44) 12(-8.75,-8.71) 13(-8.75,-9.98) 14(-8.75,-11.25) 27(8.75,-11.25) 28(8.75,-9.98) 29(8.75,-8.71) 30(8.75,-7.44) 31(8.75,-6.17) 32(8.75,-4.9) 33(8.75,-3.63) 34(8.75,-2.36) 35(8.75,-1.09) 36(8.75,0.18) 37(8.75,1.45) 38(8.75,2.72) 39(8.75,3.99) 40(8.75,5.26) gpio5(-8.75,0.18)
  rect 0.9x1.5 smd: 15(-6.985,-12.5) 16(-5.715,-12.5) 17(-4.445,-12.5) 18(-3.175,-12.5) 19(-1.905,-12.5) 20(-0.635,-12.5) 21(0.635,-12.5) 22(1.905,-12.5) 23(3.175,-12.5) 24(4.445,-12.5) 25(5.715,-12.5) 26(6.985,-12.5)
  rect 0.9x0.9 smd: 41_1(-1.5,-2.46) 41_2(-2.9,-2.46) 41_3(-0.1,-2.46) 41_4(-2.9,-3.86) 41_5(-1.5,-3.86) 41_6(-0.1,-3.86) 41_7(-2.9,-1.06) 41_8(-1.5,-1.06) 41_9(-0.1,-1.06)
  round 0.4 hole 0.2 mask+0: 41_10(-1.5,-1.76) 41_11(-2.9,-1.76) 41_12(-0.1,-1.76) 41_13(-2.9,-3.16) 41_14(-1.5,-3.16) 41_15(-0.1,-3.16) 41_16(-2.2,-1.06) 41_17(-0.8,-1.06) 41_18(-2.2,-2.46) 41_20(-2.2,-3.86) 41_21(-0.8,-3.86)
  round 0.4 all layers, no hole mask+0: 41_19(-0.8,-2.46)
  Keep-Out Layer region: 9,6.75 -9,6.75 -9,12.75 9,12.75
  Keep-Out Layer region: 9,6.75 -9,6.75 -9,12.75 9,12.75
  silkscreen extent -10.3,-12.75 9,12.75, body extent -9,-12.75 9,12.75, height 3.25

## Part data
BU03: JLCPCB Part Class="Extended Part", Manufacturer=Ai-Thinker(安信可), Manufacturer Part=BU03, Contributor=lcsc, nameAlias=Value, spicePre=U, spiceSymbolName=BU03, Supplier=LCSC, Supplier Part=C42419011
C1 C2 C6 C7 C8 C9 C10 C13 C14 C15 C20 C67 C101 C102 C103 C420 C429: "Capacitor", LatestRevisionDate=17-Jul-2002, LatestRevisionNote="Re-released for DXP Platform.", PackageDescription="Radial Cap, Thru-Hole; 2 Leads; 0.3 in Pin Spacing", PackageReference=RAD-0.3, Published=8-Jun-2000, Publisher="Altium Limited"
D5 D101 D102 D103 D420: "Typical RED, GREEN, YELLOW, AMBER GaAs LED", LatestRevisionDate=17-Jul-2002, LatestRevisionNote="Re-released for DXP Platform.", PackageDescription="SM LED; 2 Flat Leads", PackageReference=3.2X1.6X1.1, PackageVersion=Feb-2002, Published=8-Jun-2000, Publisher="Altium Limited"
D6: "INTEGRATED LIGHT SOURCE INTELLIGENT CONTROL OF CHIP-ON-TOP SMD TYPE LED", Package=Package, Check_prices=https://www.snapeda.com/parts/SK6812MINI-012/DONGGUANG+OPSCO+OPTOELECTRONICS+CO.%252C+LTD/view-part/?ref=eda, MF="DONGGUANG OPSCO OPTOELECTRONICS CO., LTD", MP=SK6812MINI-012, SnapEDA_Link=https://www.snapeda.com/parts/SK6812MINI-012/DONGGUANG+OPSCO+OPTOELECTRONICS+CO.%252C+LTD/view-part/?ref=snap
D7: library part DIODE_S, Part Number=ES313000200000, Part Reference=D7, Part Type=Diode, PCB Footprint=SOD123
D8 D9 D10: library part DIODE_BI_DIR, Part Number=ES313200200000, Part Reference=D8, Part Type=Diode, PCB Footprint=SOD523
J4: "USB - micro B USB 2.0 Receptacle Connector 5 Position Through Hole", Package=None, Availability="In Stock", Check_prices=https://www.snapeda.com/parts/USB3130-30-A/Global+Connector+Technology/view-part/?ref=eda, MF="Global Connector Technology", MP=USB3130-30-A, Price=None, SnapEDA_Link=https://www.snapeda.com/parts/USB3130-30-A/Global+Connector+Technology/view-part/?ref=snap
J420: "Charger IC Lithium Ion/Polymer SOT-23-5", Package="SOT-23 Microchip", Availability="In Stock", Check_prices=https://www.snapeda.com/parts/MCP73831T-2ACI/OT/Microchip/view-part/?ref=eda, MF=Microchip, MP=MCP73831T-2ACI/OT, Price=None, Purchase-URL=https://pricing.snapeda.com/search/part/MCP73831T-2ACI/OT/?ref=eda, SnapEDA_Link=https://www.snapeda.com/parts/MCP73831T-2ACI/OT/Microchip/view-part/?ref=snap
P67 P?: "Header, 2-Pin", LatestRevisionDate=17-Jul-2002, LatestRevisionNote="Re-released for DXP Platform.", Publisher="Altium Limited"
R5 R11 R67 R76 R101 R102 R103 R420 RLED: "Resistor", LatestRevisionDate=29-May-2009, LatestRevisionNote="IPC-7351 Footprint Added.", PackageDescription="Chip Resistor", PackageReference=J1-0603, Published=8-Jun-2000, Publisher="Altium Limited"
SW1 SW2: library part SW_SP_4P, Part Number=ES511600400000, CLASS=DISCRETE, Part Type="Tact Switch", PCB Footprint=SW4-4P2X3P2X2P5-SMT, TIME=2004-11-29
  SW1: Part Reference=SW1
  SW2: Part Reference=SW2
SW3: "Alcoswitch, Switch, Tactile, 50 mA, SPST, Pushbutton, Off[On], FSM6JSMA", Contact_Current_Rating="50 mA", Package=None, Check_prices=https://www.snapeda.com/parts/FSM6JSMA/TE+Connectivity+ALCOSWITCH+Switches/view-part/?ref=eda, Configuration_Pole-Throw="Single Pole - Single Throw", EU_RoHS_Compliance=Compliant, MF="TE Connectivity", MP=FSM6JSMA, SnapEDA_Link=https://www.snapeda.com/parts/FSM6JSMA/TE+Connectivity+ALCOSWITCH+Switches/view-part/?ref=snap
U2: library part LDO1117, Part Number=ES411402000000, Part Reference=U2, Part Type="Power ICs", PCB Footprint=SOT223
U67: JLCPCB Part Class="Extended Part", Manufacturer=TI(德州仪器), Contributor=LCSC, Manufacturer Part=DRV2605LDGST, spicePre=U, spiceSymbolName=DRV2605LDGST, Supplier=LCSC, Supplier Part=C425927
WIO-SX1262: Manufacturer=null, Manufacturer Part=Wio-SX1262, Contributor=lcsc, spicePre=U, spiceSymbolName=WIO-SX1262, Supplier=LCSC, Supplier Part=C9900220371
U4: PCB Footprint=ESP32-S3-WROOM_NEW, Reference=U4

## Via types
v1: diameter 1.27, hole 0.711, Top Layer to Bottom Layer, 58 vias
v2: diameter 1.27/1.27/1.27/1.27 (per signal layer), hole 0.711, Top Layer to Bottom Layer, 31 vias

## Nets (pads, with @x,y where several pads share a name; then routed paths per layer and width w, separated by ;. In a path a pad name is that pad's centre, name@x,y a point inside that pad or via, vN(x,y) a via of type N, cw(c..) or ccw(c..) an arc to the next point about the centre after c; other vN are vias at no path point)
3V3: BU03.5 BU03.6 BU03.7 C1.2 C2.2 C9.1 C10.1 C20.1 C101.2 C102.2 C103.2 C420.1 D6.3 R5.1 R11.1 R67.2 R76.2 U2.2 U2.4 U4.2 U67.10 WIO-SX1262.8 | length 74.1
  Top Layer w0.254: 5.147,5.422 6.475,6.75 U67.10
  Top Layer w0.5: v2(3,27) 3.8,26.2 C20.1 3.8,23.545 3.555,23.3 WIO-SX1262.8 ; 5.147,5.422 5.147,4.897 v2(5,4.75) C420.1 ; U2.4 3,38 v2(2,37) 7,32 C9.1 10,27.293 10.293,27 R11.1 ; U2.2 v2(15,38) 15.208,38 15.508,38.3 16.5,38.3 D6.3 ; v2(13,57) 13.208,57 14.008,57.8 C2.2 16,56.35 16.25,56.1 R5.1 ; v2@15.147,10.603 15.147,10.253 15.9,9.5 16.1,9.5 16.35,9.75 17.5,9.75 17.8,9.45 17.8,9.35 17.9,9.25 R67.2 ; C2.2@16.075,57.8 C1.2 19.095,57.895 22.155,57.895 22.255,57.995 27.995,57.995 v2(28,58) ; BU03.5 40.2,7.425 41.8,9.025 41.8,10.025 41.887,10.113 39.612,10.113 BU03.7 ; BU03.6 39.75,9.075 41,9.075 C103.2@41.925,10 ; C103.2 C102.2 C101.2 v2(46,8)
  other v2: 15,10.75
3V3_R: D5.1 R11.2 | length 3.2
  Top Layer w0.254: R11.2 14.75,27.1 14.973,27.323 R11.2@15.073,27.323
  Top Layer w0.5: R11.2@15.073,27.323 D5.1
5V: C7.2 C8.2 C429.1 D7.A D8.2 J4.1 J420.4 RLED.1 U2.3 | length 93.2
  Top Layer w0.254: J4.1 J4.1@8.18,57.78
  Top Layer w0.5: v1(4,33) 4,30 8,26 10,26 11,25 v1(22,25) ; v1(4,45) 5,46 5,47 ; D7.A D7.A@5,52.6 ; J4.1 8.025,57.025 5,54 D7.A@5,52.6 ; J4.1@8.18,57.78 D8.2@11.96,54 ; U2.3 11.25,40.3 11,40.55 C7.2 C8.2 11,48.5 10.707,48.793 8.793,48.793 8,48 8,47 5,47 ; v1(31,26) J420.4@35.024,26 ; RLED.1 33.1,23.75 35.024,25.674 J420.4@35.024,26 ; C429.1 34.8,26.254 J420.4@35.024,26.029 ; 5,47 3,49 3,52 3.973,52.973 4.387,52.973 4.645,52.715 4.885,52.715 D7.A@5,52.6 ; J420.4@35.024,26 35.054,26 J420.4@35.024,26.029 ; J420.4@35.024,26 J420.4@35.024,26.029
  Bottom Layer w0.5: v1(4,33) v1(4,45) ; v1(22,25) 30,25 v1(31,26)
C15_1: C15.1 D7.C | length 3.4
  Top Layer w0.254: C15.1@7.925,50 C15.1
  Top Layer w0.5: D7.C 6.925,49 C15.1@7.925,50
C67: C67.1 U67.1 | length 4.3
  Top Layer w0.254: U67.1 12.2,6.75 13.677,5.273 13.677,5.198 14,4.875 C67.1
C100: 
CHIP_PU: C6.2 C14.1 R5.2 SW2.2 U4.3 | length 37.9
  Top Layer w0.254: C6.2 17.075,54.2 17.75,54.875 R5.2 20,56 20.72,56.72 U4.3 22.53,57 25.851,57 27,55.851 27,49 v1(28,48) ; C14.1 30,33.8 30,35.108 29.54,35.568 SW2.2 29.54,37.54 v1(31,39)
  Bottom Layer w0.254: v1(28,48) 28,42 v1(31,39)
GND: BU03.8 BU03.16 BU03.24 C1.1 C2.1 C6.1 C7.1 C8.1 C9.2 C10.2 C13.2 C14.2 C15.2 C20.2 C67.2 C101.1 C102.1 C103.1 C420.2 C429.2 D5.2 D6.1 D8.1 D9.1 D10.1 D101.2 D102.2 D103.2 J4.5 J420.2 P67.1 R420.2 SW1.1 SW2.1 SW3.3 U2.1 U4.1 U4.40 U4.41_1 U4.41_2 U4.41_3 U4.41_4 U4.41_5 U4.41_6 U4.41_7 U4.41_8 U4.41_9 U4.41_10 U4.41_11 U4.41_12 U4.41_13 U4.41_14 U4.41_15 U4.41_16 U4.41_17 U4.41_18 U4.41_19 U4.41_20 U4.41_21 U67.4 U67.8 WIO-SX1262.7 WIO-SX1262.10 | length 144.7
  Top Layer w0.254: v2(4,7.75) U67.8 ; U67.4 11.163,8.263 12.513,8.263 13,8.75 v2(14,8.75)
  Top Layer w0.5: v2@3,55.355 v2(3,55) 3.147,55.147 3.147,55.502 J4.5 ; WIO-SX1262.7 4.825,23.3 5,23.475 C20.2 v2(5,27) ; v2(6,14) 6.147,13.853 7.082,13.853 8.635,12.3 WIO-SX1262.10 ; C420.2 v2(10,4.75) 11.75,3 C67.2 ; v2(8,45) 8,45.125 9.8,46.925 C8.1 C7.1 ; v2(9,53) 8.853,52.853 8.853,51.978 8.075,51.2 C15.2 9.88,51.2 D10.1 ; D9.1 D10.1 ; D8.1 D10.1 ; C10.2 C9.2 11.232,32.032 12.032,32.032 v2(15,35) ; U2.1 14.092,35.7 14.792,35 v2(15,35) ; v2(13,59) C2.1 C1.1 21.69,59 21.95,59.26 U4.1 22.45,59.06 22.65,59.26 24.087,59.26 24.792,59.965 v2(25,59.965) ; D5.2 15.147,34.603 15.147,34.853 v2(15,35) ; C6.1 18,53 v2(19,54) ; v2(21,34) 19.8,35.2 D6.1 21.2,37.2 22,38 22.46,38 SW2.1 27.26,33.2 27.875,33.2 28,33.075 C14.2 ; v2(22,5) 22.147,4.853 22.147,3.853 24.175,1.825 BU03.24 ; BU03.16 28,14.275 v2(28,17) 29.25,18.25 SW3.3 ; U4.41_15 U4.41_6 U4.41_21 U4.41_5 U4.41_20 U4.41_4 U4.41_13 U4.41_2 ; U4.41_3 U4.41_19 U4.41_1 U4.41_18 U4.41_2 ; U4.41_9 U4.41_17 U4.41_8 U4.41_16 U4.41_7 U4.41_11 U4.41_2 ; SW1.1 34.46,34.34 35.6,33.2 35.675,33.2 35.8,33.075 C13.2 ; C429.2 v2(38,28) P67.1 ; v2(36,59) 37.773,59 38.033,59.26 U4.40 ; R420.2 v2(39,22) ; J420.2 38.029,25.031 39.969,25.031 v2(40,25) ; BU03.8@39.25,11.375 BU03.8 ; BU03.8@39.375,11.5 BU03.8 ; v2(47,14) 47,12.2 46.2,11.4 46.2,11.325 46.075,11.2 C101.1 C102.1 C103.1 41.925,11.2 41.5,11.625 BU03.8 ; v2(47,40) 49.75,40 D103.2 ; v2(47,47) 49.75,47 D102.2 ; v2(47,54) 49.75,54 D101.2
GPIO0: C13.1 SW1.2 U4.27 | length 10.9
  Top Layer w0.254: C13.1 37,33.075 39.54,35.615 SW1.2 39.54,42.54 U4.27
GPIO1: R76.1 U4.39 U67.3 | length 95.2
  Top Layer w0.254: U67.3 15.65,7.75 15.9,8 R76.1 v1(16,6) ; U4.39 40.05,57.99 40.593,58.533 40.615,58.533 42,59.918 v1(42,60)
  Bottom Layer w0.254: v1(16,6) 18,4 18,3.149 18.149,3 41.851,3 42,3.149 42,45 42.596,45.596 42.596,48.404 42,49 v1(42,60)
GPIO2: U4.38 U67.5 | length 126.2
  Top Layer w0.254: U67.5 11.745,8.75 13,10.005 13,13 v1(12,14) ; U4.38 40.073,57.043 41.043,57.043 v1(44,60)
  Bottom Layer w0.254: v1(12,14) 8,14 6,12 6,7 5,6 4.149,6 4,5.851 4,4 6,2 42,2 43,3 43,48 44,49 v1(44,60)
GPIO3: SW3.2 U4.15 | length 14.7
  Top Layer w0.254: v1(23,30) 23.219,30 23.669,29.55 SW3.2 ; v1(23,39) 24,40 24,41.485 U4.15
  Bottom Layer w0.254: v1(23,30) 24,31 24,34.218 23,35.218 v1(23,39)
GPIO4: BU03.22 U4.4 | length 60.4
  Top Layer w0.254: U4.4 23.381,55.45 23.831,55 v1(24,55) ; v1(23,15) 23,13 v1(24,12) ; v1(24,5) 24.275,5 24.65,4.625 BU03.22 ; v1(24,47) 24.996,47.996 v1(24.996,49.996)
  Bottom Layer w0.254: v1(23,15) 20,18 20,38 26,44 26,45 v1(24,47) ; v1(24,5) v1(24,12) ; v1(24,55) 24.996,54.004 v1(24.996,49.996)
GPIO5: BU03.17 U4.gpio5 | length 51.8
  Top Layer w0.254: U4.gpio5 22.573,53.857 24.143,53.857 25,53 v1(25.912,53) ; v1(25,33) 22.149,33 22,32.851 22,28 23,27 23,19 25.768,16.232 25.768,11.998 26.141,11.625 BU03.17 ; v1(26,48) v1(26,51)
  Bottom Layer w0.254: v1(25,33) 27,35 27,47 v1(26,48) ; v1(25.912,53) 25.956,52.956 25.956,51.044 v1(26,51)
GPIO6: U4.6 WIO-SX1262.1 | length 37.7
  Top Layer w0.254: WIO-SX1262.1 12.445,22.859 12.618,23.032 14.968,23.032 v1(15,23) ; v1(18,48) 19,49 19,52.761 19.149,52.91 U4.6
  Bottom Layer w0.254: v1(15,23) 15,33 18,36 v1(18,48)
GPIO7: U4.7 WIO-SX1262.5 | length 38.9
  Top Layer w0.254: v1(7,25) 7,24.725 7.365,24.36 WIO-SX1262.5 ; v1(15,50) v1(17,50) ; v1(20,51) 20.275,51 20.592,51.317 21.927,51.317 U4.7
  Bottom Layer w0.254: v1(7,25) 7,33 15,41 v1(15,50) ; v1(17,50) 19,50 v1(20,51)
GPIO8: R67.1 U4.12 U67.2 | length 115.4
  Top Layer w0.254: U67.2 12.75,7.25 15.895,4.105 16.105,4.105 18,6 ; R67.1 18,6 ; U4.12 22.54,45 27,45 29,47 v1(31,47) ; v1(41.684,47) 41.684,45.316 44.088,42.912 44.378,42.912 44.912,42.378 44.912,41.622 44.088,40.798 44.088,38.912 48.72,34.28 48.72,4.3 48.019,3.598 46.149,3.598 46,3.449 46,1.149 45.851,1 19,1 18,2 18,6
  Bottom Layer w0.254: v1(31,47) v1(41.684,47)
GPIO9: U4.17 WIO-SX1262.6 | length 58.1
  Top Layer w0.254: WIO-SX1262.6 6.095,21.7 4.395,20 4,20 1,23 1,43.851 1.149,44 7,44 v1(8,43) ; v1(13,43) 18,43 20,41 23,41 23.288,41.288 23.288,42.365 23.923,43 25.851,43 26.232,42.619 26.232,41.823 U4.17
  Bottom Layer w0.254: v1(8,43) v1(13,43)
GPIO10: BU03.3 U4.18 | length 68.6
  Top Layer w0.254: U4.18 27.825,42.825 29,44 v1(29,44.088) ; BU03.3 40.2,4.625 40.573,4.252 40.573,4.151 40.722,4.002 47.851,4.002 48,4.151 48,32 40.772,39.228 v1(40.772,41.564)
  Bottom Layer w0.254: v1(29,44.088) 29,45 30,46 38.192,46 41.088,43.104 41.088,42.663 40.966,42.541 40.966,41.758 v1(40.772,41.564)
GPIO11: BU03.18 U4.19 WIO-SX1262.3 | length 65.6
  Top Layer w0.254: WIO-SX1262.3 9.952,22.453 9.952,17.048 v1(10,17) ; BU03.18 26.725,10 v1(30,10) ; v1(29,39) 29,41.405 U4.19
  Bottom Layer w0.254: v1(10,17) 11,17 14,14 26,14 v1(30,10) 30,18 32,20 32,36 v1(29,39)
GPIO12: BU03.20 U4.20 WIO-SX1262.4 | length 79
  Top Layer w0.254: WIO-SX1262.4 8.635,20.64 9,20.275 v1(9,20) ; v1(15,16) 15.016,15.984 15.016,13.984 21.575,7.425 BU03.20 31.425,7.425 v1(34,10) ; U4.20 30.688,41.823 30.688,43.413 31,43.725 v1(31,44)
  Bottom Layer w0.254: v1@9.016,19.984 13,16 v1(15,16) ; v1(31,44) 36.851,44 37,43.851 37,34 36,33 36,20 34,18 v1(34,10)
GPIO13: BU03.19 U4.21 WIO-SX1262.2 | length 63
  Top Layer w0.254: WIO-SX1262.2 11.175,21.7 11.348,21.527 11.473,21.527 24.068,8.932 26.393,8.932 BU03.19 30.825,8.825 v1(32,10) ; U4.21 31.635,40.365 33,39 v1(34,39)
  Bottom Layer w0.254: v1(32,10) 32,18 34,20 34,33 36,35 36,37 v1(34,39)
GPIO14: U4.22 WIO-SX1262.11 | length 65.1
  Top Layer w0.254: v1(7,20) 7,15 8,14 8.205,14 9.905,12.3 WIO-SX1262.11 ; v1(13,30) 13.016,30.016 14.016,30.016 15,31 20,31 v1(21,32) ; v1(23,32) 26,32 27,31 38,31 v1(40,33) ; U4.22 32.905,40.149 33.054,40 36,40 37,39 v1(38,39)
  Bottom Layer w0.254: v1(7,20) 13,26 v1(13,30) ; v1(21,32) v1(23,32) ; v1(38,39) 38,35 v1(40,33)
GPIO15: U4.8 WIO-SX1262.12 | length 45.4
  Top Layer w0.254: WIO-SX1262.12 11.168,11.507 11.168,12.832 10.105,13.895 10.105,14.105 12,16 v1(12,19) ; v1(19,46) 19,48 21.268,50.268 22.148,50.268 U4.8
  Bottom Layer w0.254: v1(12,19) 13,19 16,22 16,32 19,35 v1(19,46)
GPIO19: D9.2 J4.3 U4.13 | length 23.5
  Top Layer w0.254: D9.2 12.04,50 13,50.96 v1(13,51) 13,50 18.98,44.02 U4.13
  Bottom Layer w0.254: J4.3 6.806,57.699 6.806,57.194 v1@12.984,51.016
GPIO20: D10.2 J4.2 U4.14 | length 33.6
  Top Layer w0.254: D10.2 v1(15,52) ; v1(16,45) 17,45 19,43 22,43 U4.14
  Bottom Layer w0.254: J4.2 8.595,60 14.851,60 15,59.851 v1(15,52) 16,51 v1(16,45)
GPIO35: R103.1 U4.28 | length 10.8
  Top Layer w0.254: U4.28 41.98,44.02 v1(44,42) ; v1(44,45) 45.25,45 45.927,44.323 46.027,44.323 46.25,44.1 R103.1
  Bottom Layer w0.254: v1(44,42) v1(44,45)
GPIO38: D6.2 U4.31 | length 34.7
  Top Layer w0.254: v1(17,42) 17.194,41.806 17.194,40.406 18.85,38.75 D6.2 ; v1(33,49) 34,48 39.58,48 U4.31
  Bottom Layer w0.254: v1(17,42) 17,48.851 17.149,49 v1(33,49)
GPIO39: R102.1 U4.32 | length 7.3
  Top Layer w0.254: U4.32 44.45,49.1 46.25,50.9 R102.1
GPIO42: R101.1 U4.35 | length 8.2
  Top Layer w0.254: U4.35 40.91,52.91 45,57 R101.1
LED: D420.1 RLED.2 | length 3.4
  Top Layer w0.254: RLED.2 33,19.25 D420.1
LED1: D101.1 R101.2 | length 2.6
  Top Layer w0.254: R101.2 49.25,57 D101.1
LED2: D102.1 R102.2 | length 2.4
  Top Layer w0.254: R102.2 49.75,51 D102.1
LED3: D103.1 R103.2 | length 2.4
  Top Layer w0.254: R103.2 47.75,43.973 47.973,43.75 D103.1
OUT+: P?.2 U67.7 | length 5.2
  Top Layer w0.254: P?.2 2.202,9.02 2.472,8.75 5,8.75 5.5,8.25 U67.7
OUT-: P?.1 U67.9 | length 5.5
  Top Layer w0.254: P?.1 3,6.75 5,6.75 5.5,7.25 U67.9
PH1: J420.3 P67.2 | length 2.3
  Top Layer w0.5: J420.3 39.27,26 P67.2
PH2: 
PROG: J420.5 R420.1 | length 2.1
  Top Layer w0.254: R420.1@35.409,22 J420.5
STAT: D420.2 J420.1 | length 10.1
  Top Layer w0.254: D420.2 39.851,19 40,19.149 40,23.851 39.731,24.12 J420.1
pads on no net: BU03.1 BU03.2 BU03.4 BU03.9 BU03.10 BU03.11 BU03.12 BU03.13 BU03.14 BU03.15 BU03.21 BU03.23 D6.4 J4. J4.4 J4.6 J4.7 SW3.1 SW3.4 U4.9 U4.10 U4.11 U4.16 U4.23 U4.24 U4.25 U4.26 U4.29 U4.30 U4.33 U4.34 U4.36 U4.37 U67.6 WIO-SX1262.9

## Polygon pours and split planes (outlines as drawn)
3V3 on Mid-Layer 2 "3V3_L03_P001" (solid, pour order 1): 0,61 53,61 53,0 0,0
GND on Mid-Layer 1 "GND_L02_P000" (solid, remove dead copper, pour order 0): 0,61 53,61 53,0 0,0

## Text inside footprints (layer, text, board x,y; h text height)
U4: Mechanical 13 "ANTENNA" at 26.5,63.5 h1.27